# Altium PCB SENSBOXER.PcbDoc
Units mm, origin at the board's own origin, x right, y up, seen from the top; angles counter-clockwise.
Board outline 44.07 x 44.07 mm, 2 copper layers (Top Layer, Bottom Layer), stack 1.671 mm thick; 16 components, 12 nets, 65 pads, 28 vias.
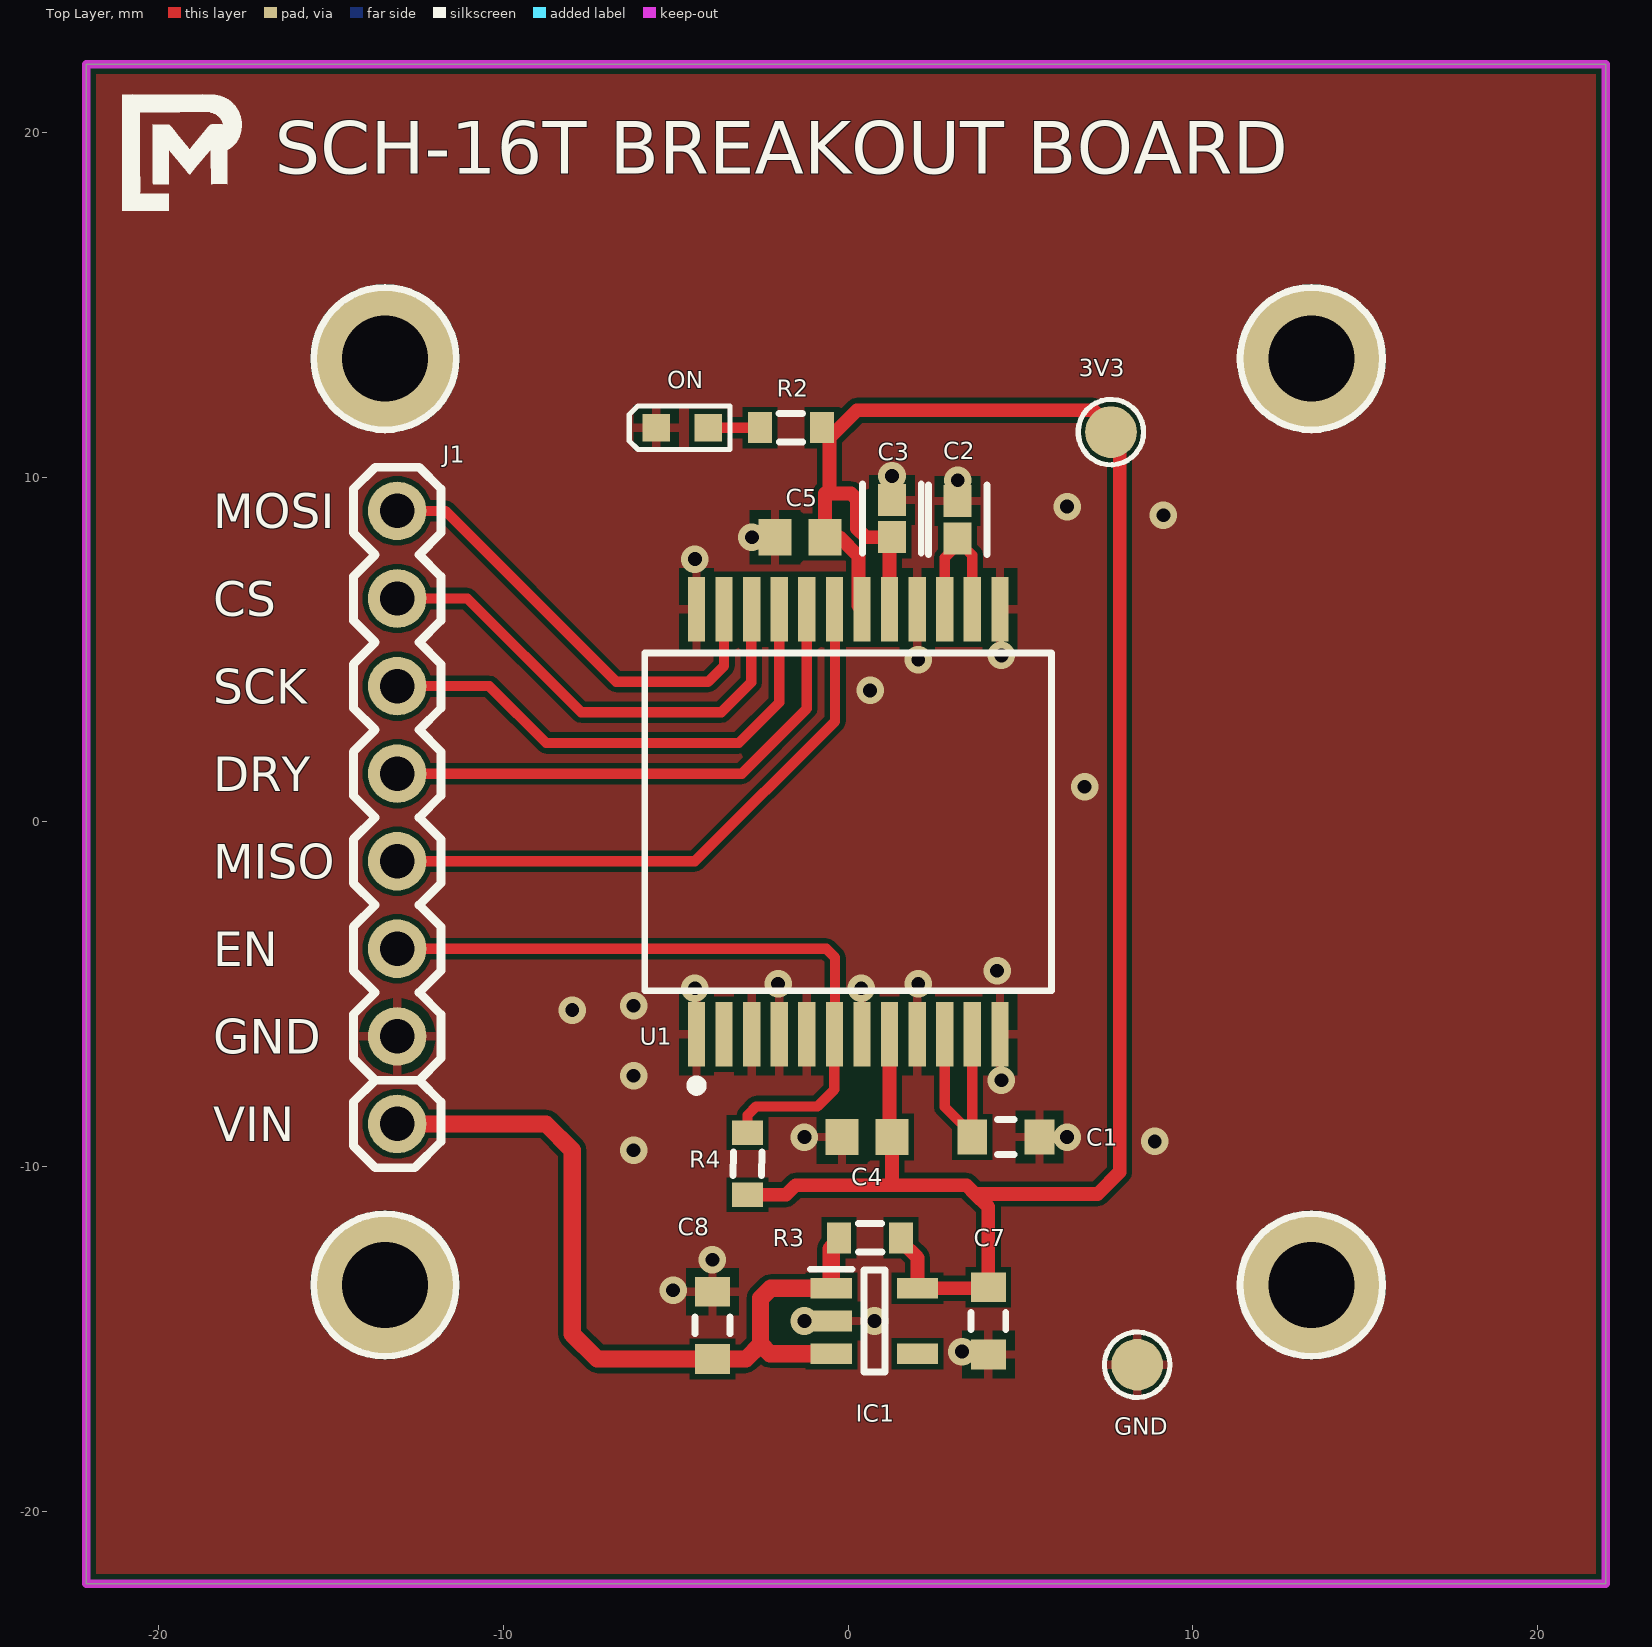
[diagram p0: Top Layer view]
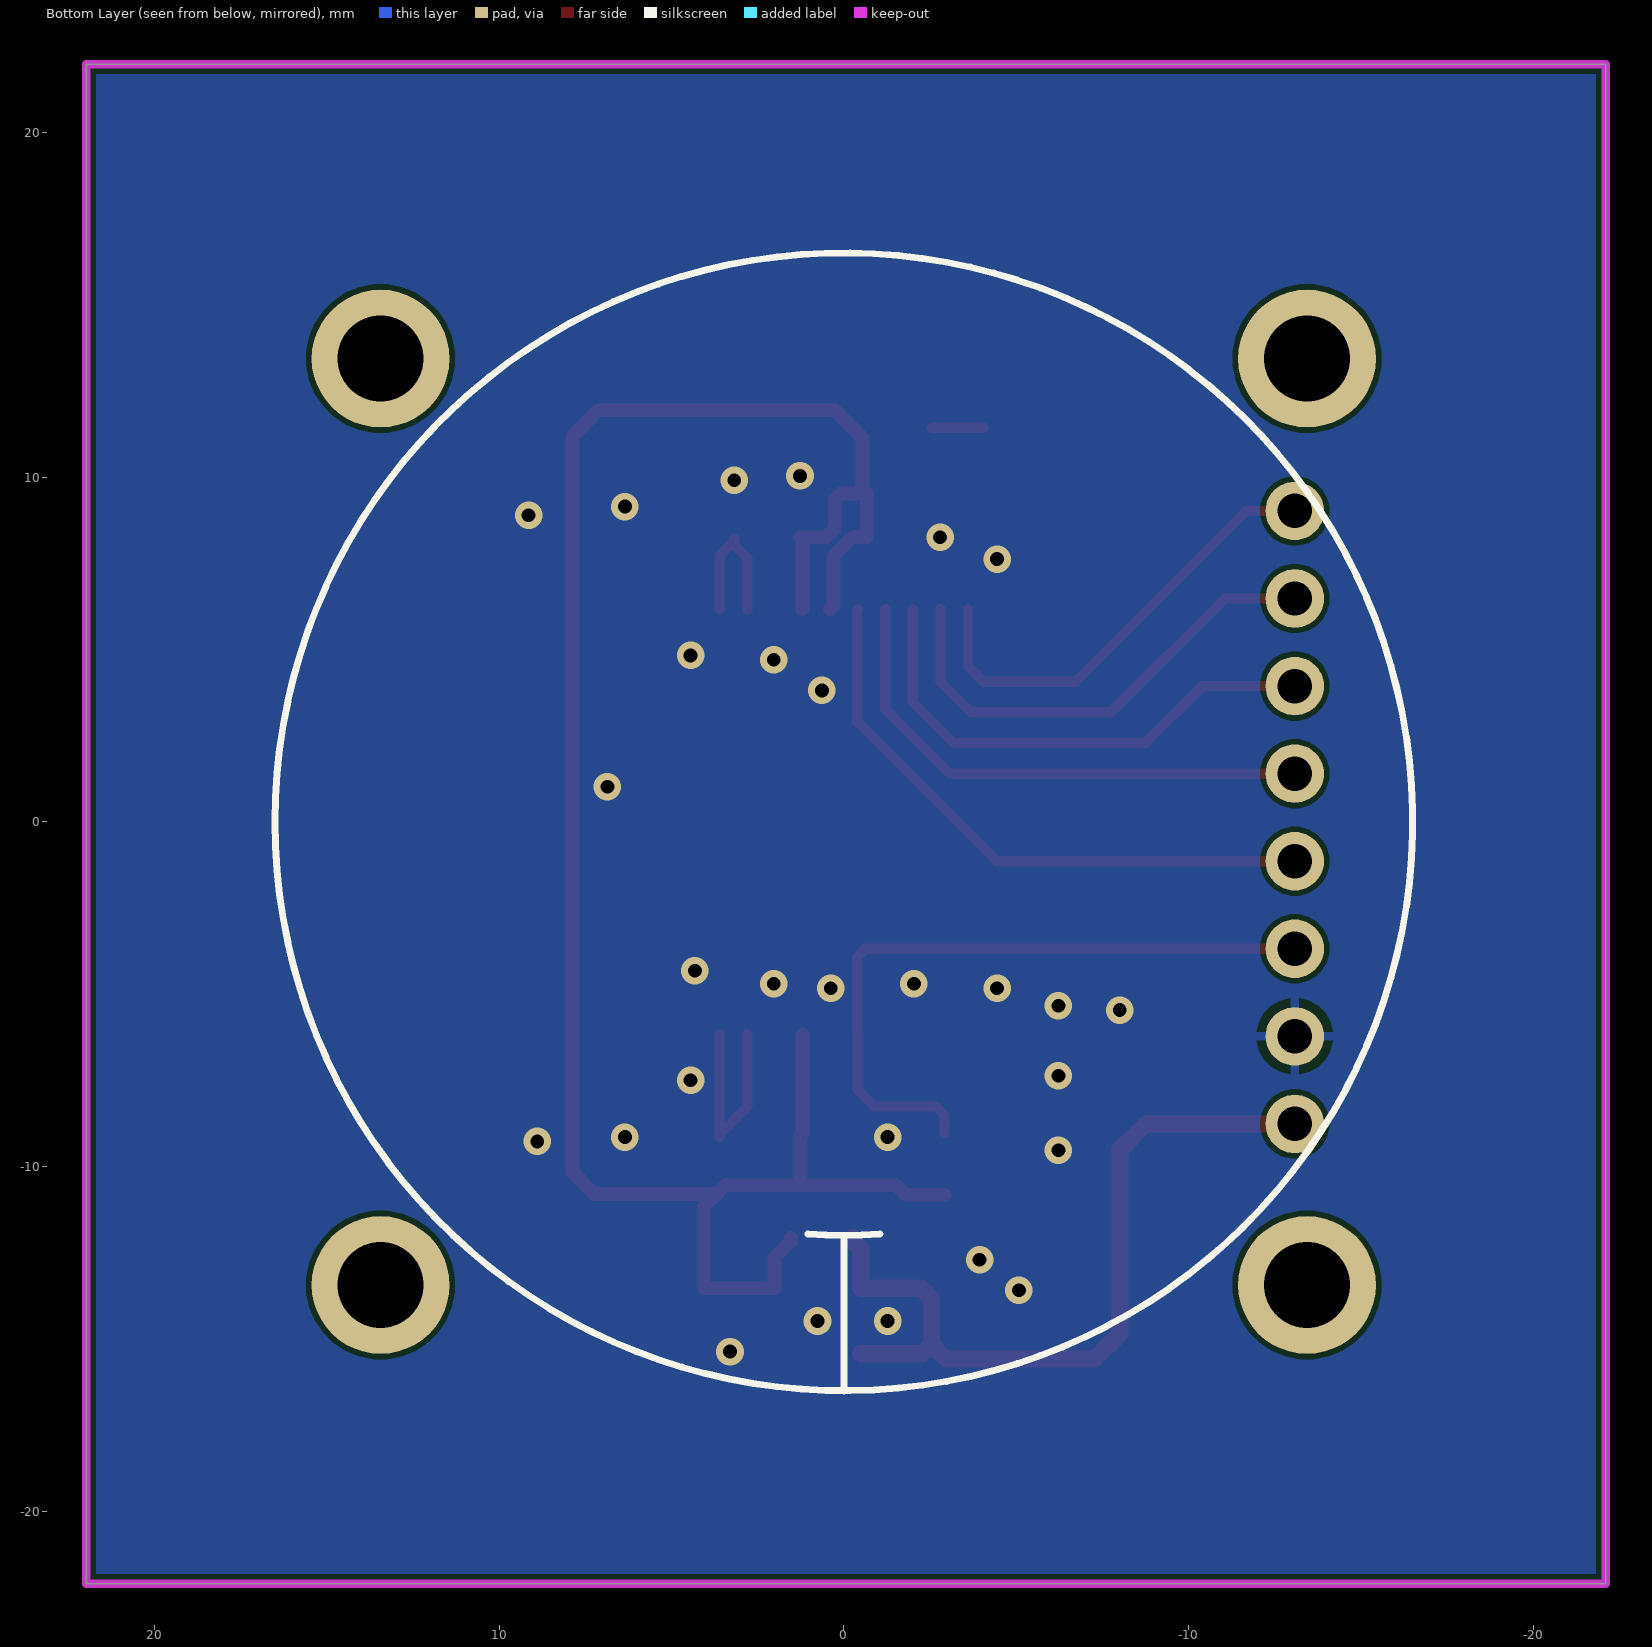
[diagram p1: Bottom Layer view, seen from below]

## Layer stack, top to bottom
Top Solder: solder mask 0.0102, Solder Resist, Dk 3.5
Top Layer: signal copper 0.0356
Dielectric 1: dielectric 1.6, FR-4, Dk 4.8
Bottom Layer: signal copper 0.0356
Bottom Solder: solder mask 0.0102, Solder Resist, Dk 3.5

## Board outline
-22.098,-22.098 -22.098,21.971 21.971,21.971 21.971,-22.098

## Design rules (kind name [scope] priority, off if disabled: settings)
Clearance [All] p1: gap=0.15 ignorepadtopadclearanceinfootprint=FALSE
ComponentClearance [All] p1: gap=0 collisioncheckmode=3 verticalgap=0 showdistances=FALSE
PolygonConnect PolygonConnect_1 [IsVia  OR HasFootprint('VFQFPN36')] p1: connectstyle=Direct reliefconductorwidth=0.254 reliefentries=4 polygonreliefangle="90 Angle" airgapwidth=0.254
PolygonConnect [All] p2: connectstyle=Relief reliefconductorwidth=0.254 reliefentries=4 polygonreliefangle="90 Angle" airgapwidth=0.254
RoutingVias [All] p1: holewidth=0.5 width=1 viastyle="Through Hole" minholewidth=0.4 minwidth=0.8 maxholewidth=0.5 maxwidth=1
SolderMaskExpansion [All] p1: expansion=0.102 istentingtop=FALSE
SupplyNets "Schematic Supply Nets_2" [InNet('VIN')] p1: voltage=0.000
SupplyNets "Schematic Supply Nets_1" [InNet('+3.3V')] p2: voltage=0.000
SupplyNets "Schematic Supply Nets" [InNet('GND')] p3: voltage=0.000
Width [All] p1: maxlimit=1 minlimit=0.3 preferedwidth=0.3
29 further rules are at their usual default settings.

## Components (designator, comment, footprint, x,y, rotation, side; value= is the part's Value field where it differs from the comment)
3V3 "Ø1.5mm,SMD" TP_SMD_Ø1.5mm 7.62,11.303 r0 top
C1 "C1608X5R1E106M080AC" FP-C1608-080-IPC_A 4.572,-9.144 r180 top value=10u
C2 "C1608X7R1E105K080AB" FP-C1608-080-0_1-IPC_C 3.175,8.763 r90 top value=1u
C3 "C1608X7R1E105K080AB" FP-C1608-080-0_1-IPC_C 1.27,8.796 r90 top value=1u
C4 "GRM188R71H104KA93D" CAPC1608X90X35ML10T15 0.545,-9.144 r180 top value=100n
C5 "GRM188R71H104KA93D" CAPC1608X90X35ML10T15 -1.397,8.255 r180 top value=100n
C7 "C1608X5R1E106M080AC" FP-C1608-080-IPC_A 4.064,-14.478 r90 top value=10u
C8 "C1608X5R1E106M080AC" FP-C1608-080-IPC_A -3.937,-14.605 r270 top value=10u
GND "Ø1.5mm,SMD" TP_SMD_Ø1.5mm 8.382,-15.748 r0 top
IC1 "AP2125K-3.3TRG1" SOT95P282X145-5N 0.762,-14.478 r0 top
J1 "CONN-8" PHDR8 -13.081,0.127 r90 top
ON "LED" led-0603 -4.064,11.43 r180 top
R2 "1K" R0603 -1.662,11.43 r0 top
R3 "0(NC)" R0603 0.635,-12.065 r180 top
R4 "1K" R0603 -2.921,-9.917 r90 top
U1 "SCH16T-K01-1" SCH16TK011 0,0 r90 top

## Footprints (in the part's own frame and the unit in brackets; to place one, negate y for a bottom-side part, rotate by r counter-clockwise, add the part's x,y. Pads: shape width x height; smd on the part's side, far side on the other; paste and mask are expansions set on the pad)
CAPC1608X90X35ML10T15 [mm] "Chip Capacitor, 2-Leads, Body 1.7x0.9mm, IPC Low Density"
  rect 0.95x1.05 smd: 1(-0.725,0) 2(0.725,0)
  body extent -0.85,-0.45 0.85,0.45, height 0.9
FP-C1608-080-0_1-IPC_C [mm]
  rect 0.931x0.812 smd paste+0 mask+0: 1(-0.541,0) 2(0.541,0)
  silkscreen extent -1.01,-0.85 1.01,0.85, body extent -1.11,-0.55 1.11,0.55, height 0.25
FP-C1608-080-IPC_A [mm]
  rect 0.862x1.012 smd paste+0 mask+0: 1(-0.975,0) 2(0.975,0)
  silkscreen extent -0.24,-0.51 0.24,0.51, body extent -1.91,-1.01 1.91,1.01, height 0.25
led-0603 [mm]
  rect 0.8x0.8 smd: 1(0,0) 2(1.5,0)
  silkscreen extent -0.64,-0.64 2.29,0.64, body extent -0.04,-0.41 1.56,0.38, height 0.7
PHDR8 [mm]
  round 1.7 hole 1: 1(-8.89,0) 2(-6.35,0) 3(-3.81,0) 4(-1.27,0) 5(1.27,0) 6(3.81,0) 7(6.35,0) 8(8.89,0)
  silkscreen extent -10.16,-1.27 10.16,1.27, body extent -10.19,-1.24 10.13,1.3, height 8.38
R0603 [mm]
  rect 0.7x0.9 smd: 1(-0.9,0) 2(0.9,0)
  silkscreen extent -0.34,-0.42 0.34,0.42, body extent -0.76,-0.38 0.76,0.38, height 0.45
SCH16TK011 [mm]
  rect 1.87x0.5 smd: 1(-6.165,4.4) 2(-6.165,3.6) 3(-6.165,2.8) 4(-6.165,2) 5(-6.165,1.2) 6(-6.165,0.4) 7(-6.165,-0.4) 8(-6.165,-1.2) 9(-6.165,-2) 10(-6.165,-2.8) 11(-6.165,-3.6) 12(-6.165,-4.4) 13(6.165,-4.4) 14(6.165,-3.6) 15(6.165,-2.8) 16(6.165,-2) 17(6.165,-1.2) 18(6.165,-0.4) 19(6.165,0.4) 20(6.165,1.2) 21(6.165,2) 22(6.165,2.8) 23(6.165,3.6) 24(6.165,4.4)
  silkscreen extent -7.7,-5.9 4.9,5.9, body extent -6.6,-5.9 6.6,5.9, height 2.86
SOT95P282X145-5N [mm]
  rect 1.2x0.6 smd: 1(-1.25,0.95) 2(-1.25,0) 3(-1.25,-0.95) 4(1.25,-0.95) 5(1.25,0.95)
  silkscreen extent -1.85,-1.48 0.3,1.5, body extent -1.41,-1.48 1.41,1.48, height 1.45
TP_SMD_Ø1.5mm [mm]
  round 1.5 smd paste-5: 1(0,0)
  silkscreen extent -0.95,-0.95 0.95,0.95

## Part data
3V3 GND: library part TP_SMD_Ø1.5MM, "1.5mm circular SMD testpad", Manufacturer="Nordic Semiconductor", Manufacturer Part Number=N.A., Artikkelnr Noca=N.A., Component Class=Connectors, ComponentLink1Description=Datasheet, ComponentLink1URL=N.A., ComponentLink2Description="Supplier link", ComponentLink2URL=N.A., Footprint Doc=TP_SMD_Ø1.5mm, HelpURL=N.A., LatestRevisionDate=2016-06-02, Note=N.A., Pad Count=1, Part Number=TP_SMD_Ø1.5MM, Part number IPS=N.A., PartId=100500477, Published=2016-06-02, Supplier 1=N.A., Supplier 2=N.A., Supplier Part Number 1=N.A., Supplier Part Number 2=N.A.
C1 C7 C8: library part CMP-2000-05442-2, "CAP CER 10UF 25V X5R 0603", Capacitance=10uF, Case Code (Imperial)=0603, Case Code (Metric)=1608, Dielectric=X5R, Dielectric Material=Ceramic, Max Operating Temperature=85°C, Min Operating Temperature=-55°C, Package Quantity=1, Tolerance=20%, Voltage Rating=25V, Case/Package=0603, Construction=Flat, Depth=0.8mm, Height=0.8mm, Lead Free="Lead Free", Length=1.6mm, Mount="Surface Mount", Packaging="Tape and Reel", REACH SVHC="No SVHC", Resistor Type=Ceramic, RoHS Compliant=Yes, Series=C, Termination=SMD/SMT, Thickness=0.039inch, Voltage Rating (DC)=25V, Weight=7.1E-05oz, Width=0.8mm
C2 C3: library part CMP-08246-005723-1, "Multilayer Ceramic Capacitors 1μF ±10% 25V X7R SMD 0603", Capacitance=1uF, Case Code (Imperial)=0603, Case Code (Metric)=1608, Dielectric=X7R, Dielectric Material=Ceramic, Max Operating Temperature=125°C, Min Operating Temperature=-55°C, Package Quantity=4000, Tolerance=10%, Voltage=25V, Case/Package=0603, Construction=Flat, Depth=0.8mm, Height=0.8mm, Lead Free="Lead Free", Length=1.6mm, Mount="Surface Mount", Packaging="Tape and Reel", Radiation Hardening=No, REACH SVHC="No SVHC", Resistor Type=Ceramic, RoHS Compliant=Yes, Series=C, Termination=SMD/SMT, Thickness=0.037inch, Voltage Rating=25V, Voltage Rating (DC)=25V, Weight=7.1E-05oz, Width=0.031inch
C4 C5: library part CMP-2100-03643-1, "Chip Capacitor, 0.1 uF, +/- 10%, 50 V, -55 to 125 degC, 0603 (1608 Metric), RoHS, Tape and Reel", Capacitance=100nF, Case Code (Imperial)=0603, Case Code (Metric)=1608, Dielectric=X7R, Dielectric Material=Ceramic, Insulation Resistance=10GR, Manufacturer=Murata, Max Operating Temperature=125degC, Min Operating Temperature=-55degC, Package Description="2-Pin Surface Mount Device, Body 1.6 x 0.8 mm", Package Quantity=1, Tolerance=10%, Voltage=50V, Case/Package=0603, Contact Plating=Tin, Datasheet URL=http://psearch.en.murata.com/capacitor/product/GRM188R71H104KA93%23.pdf, Datasheet Version=42675.0, Depth=0.8mm, Height=0.8mm, Lead Free=LeadFree, Length=1.6mm, Manufacturer URL=http://www.murata.com/, Material=Ceramic, Mount=SurfaceMount, Number of Pins=2, Package Reference=0603, Packaging=TapeandReel, Radiation Hardening=No, REACH SVHC=NoSVHC, RoHSCompliant=true, Termination=SMD/SMT, Thickness=0.035inch, Voltage Rating=50V, Voltage Rating (DC)=50V, Width=0.8mm
IC1: "Integrated Circuit", Manufacturer_Name="Diodes Incorporated", Mouser Part Number=621-AP2125K-3.3TRG1, Arrow Part Number=AP2125K-3.3TRG1, Arrow Price/Stock=https://www.arrow.com/en/products/ap2125k-3.3trg1/diodes-incorporated?region=nac, Datasheet Link=https://www.diodes.com//assets/Datasheets/AP2125.pdf, Height=1.45mm, Manufacturer_Part_Number=AP2125K-3.3TRG1, Mouser Price/Stock=https://www.mouser.co.uk/ProductDetail/Diodes-Incorporated/AP2125K-3.3TRG1?qs=x6A8l6qLYDC5mCIw9pxEEw%3D%3D
R2 R3 R4: library part Resistor, "Resistor", Designer="Parsa Malekpour"
U1: "Undefined or Miscellaneous", Manufacturer_Name="Murata Electronics", Mouser Part Number=81-SCH16T-K01-1, Arrow Part Number=SCH16T-K01-1, Arrow Price/Stock=https://www.arrow.com/en/products/sch16t-k01-1/murata-manufacturing?utm_currency=USD&region=nac, Datasheet Link=https://www.murata.com/-/media/webrenewal/products/sensor/pdf/datasheet/datasheet-sch16t-series-short.ashx?la=en-us&cvid=20240110024121000000, Height=3mm, Manufacturer_Part_Number=SCH16T-K01-1, Mouser Price/Stock=https://www.mouser.co.uk/ProductDetail/Murata-Electronics/SCH16T-K01-1?qs=HFfMDpzxxd0hctvcENbFhg%3D%3D

## Free pads (board coordinates)
  round 4 hole 2.5: 3(13.435,13.435) 4(-13.435,13.435) 5(-13.435,-13.435) 6(13.435,-13.435)

## Via types
v1: diameter 0.8, hole 0.4, Top Layer to Bottom Layer, tented both sides, 28 vias

## Nets (pads, with @x,y where several pads share a name; then routed paths per layer and width w, separated by ;. In a path a pad name is that pad's centre, name@x,y a point inside that pad or via, vN(x,y) a via of type N, cw(c..) or ccw(c..) an arc to the next point about the centre after c; other vN are vias at no path point)
+3.3V: 3V3.1 C3.1 C4.1 C5.1 C7.2 IC1.5 R2.2 R3.1 R4.1 U1.8 U1.17 U1.18 | length 63.2
  Top Layer w0.4: R4.1 -1.8,-10.817 -1.524,-10.541 1.27,-10.541 ; -0.672,9.525 C5.1 -0.254,8.255 0.3,7.701 0.3,6.265 U1.18 ; U1.8 1.2,-9.074 C4.1 1.27,-10.541 ; U1.17 C3.1@1.2,8.255 ; C3.1 C3.1@1.2,8.255 ; R3.1 1.535,-12.165 2.012,-12.642 IC1.5 C7.2@3.998,-13.528 ; C7.2 4.064,-11.176 3.683,-10.795 ; C3.1@1.2,8.255 0.508,8.255 0.254,8.509 0.254,9.349 0.078,9.525 -0.545,9.525 -0.545,11.139 0.254,11.938 7.112,11.938 7.874,11.176 7.874,-10.16 7.239,-10.795 3.683,-10.795 ; 1.27,-10.541 3.429,-10.541 3.683,-10.795
CS: J1.7 U1.22 | length 14.1
  Top Layer w0.3: J1.7 -11.049,6.477 -7.747,3.175 -3.683,3.175 -2.811,4.047 -2.811,6.154 U1.22
DRY: J1.5 U1.20 | length 15.5
  Top Layer w0.3: J1.5 -3.089,1.397 -1.2,3.286 U1.20
EXTRESN: J1.3 R4.2 U1.6 | length 20
  Top Layer w0.3: J1.3 -0.635,-3.683 -0.381,-3.937 -0.381,-6.146 U1.6 -0.4,-7.766 -0.889,-8.255 -2.667,-8.255 -2.921,-8.509 R4.2
GND: C1.1 C2.2 C3.2 C4.2 C5.2 C7.1 C8.1 GND.1 IC1.2 J1.2 ON.2 U1.1 U1.3 U1.4 U1.5 U1.7 U1.9 U1.12 U1.13 U1.16 U1.24
  other v1: 3.302,-15.367 -1.27,-14.478 0.762,-14.478 -5.08,-13.589 -3.937,-12.7 -6.223,-9.525 8.89,-9.271 -1.27,-9.144 6.35,-9.144 4.445,-7.493 -6.223,-7.366 -8.001,-5.461 -6.223,-5.334 -4.445,-4.826 0.381,-4.826 -2.032,-4.699 2.032,-4.699 4.318,-4.318 6.858,1.016 0.635,3.81 2.032,4.699 4.445,4.826 -4.445,7.62 -2.794,8.255 9.144,8.89 6.35,9.144 3.175,9.906 1.27,10.033
MISO: J1.4 U1.19 | length 17.6
  Top Layer w0.3: J1.4 -4.445,-1.143 -0.381,2.921 -0.381,6.146 U1.19
MOSI: J1.8 U1.23 | length 13.4
  Top Layer w0.3: J1.8 -11.684,9.017 -6.731,4.064 -4.064,4.064 -3.6,4.528 U1.23
NetC1_2: C1.2 U1.10 U1.11 | length 6.3
  Top Layer w0.3: U1.10 2.8,-8.272 3.597,-9.069 C1.2 3.598,-9.143 U1.11 U1.11
NetC2_1: C2.1 U1.14 U1.15 | length 4.3
  Top Layer w0.3: U1.15 2.8,7.661 C2.1@3.238,8.1 ; C2.1 3.175,8.163 C2.1@3.238,8.1 ; U1.14 3.6,7.738 C2.1@3.238,8.1
NetON_1: ON.1 R2.1 | length 1.5
  Top Layer w0.3: ON.1 R2.1
SCK: J1.6 U1.21 | length 15
  Top Layer w0.3: J1.6 -10.414,3.937 -8.763,2.286 -3.175,2.286 -2,3.461 U1.21
VIN: C8.2 IC1.1 IC1.3 J1.1 R3.2 | length 23.9
  Top Layer w0.5: J1.1 -8.763,-8.763 -8.001,-9.525 -8.001,-14.859 -7.28,-15.58 C8.2 -2.966,-15.58 -2.54,-15.154 ; IC1.3 -2.266,-15.428 -2.54,-15.154 ; R3.2 -0.265,-12.165 -0.488,-12.388 IC1.1 -2.247,-13.528 -2.54,-13.821 -2.54,-15.154
pads on no net: IC1.4 U1.2

## Polygon pours and split planes (outlines as drawn)
GND on Bottom Layer "GND_L02_P000" (solid, remove dead copper, pour order 0): -22.098,21.971 -22.098,-22.098 21.971,-22.098 21.971,21.971
GND on Top Layer "GND_L01_P001" (solid, remove dead copper, pour order 1): -22.098,21.971 -22.098,-22.098 21.971,-22.098 21.971,21.971

## Keep-outs
Keep-Out Layer:
  the board outline again, w0.254

## Silkscreen, mask and mechanical layers (free items; w line width, h text height)
Top Overlay:
  drawing of 6 lines, arcs and shapes, not listed
  text "SCH-16T BREAKOUT BOARD" at -16.637,18.796 h1.52
  text "MOSI" at -18.415,8.509 h1
  text "CS" at -18.415,5.969 h1
  text "SCK" at -18.415,3.429 h1
  text "DRY" at -18.415,0.889 h1
  text "MISO" at -18.415,-1.651 h1
  text "EN" at -18.415,-4.191 h1
  text "GND" at -18.415,-6.731 h1
  text "VIN" at -18.415,-9.271 h1
Bottom Overlay:
  circle w0.2: c0,0 r16.5
  lines w0.2: -1.046,-11.954 ccw(c0,0) 1.046,-11.954 ; 0,-16.51 0,-12.065